# Altium PCB LED_Control.PcbDoc (part 2 of 3)
Units mil, origin at the board's own origin, x right, y up, seen from the top; angles counter-clockwise.
Board outline 2900 x 5000 mil, 4 copper layers (Top Layer, GND1, GND2, Bottom Layer), stack 51.864 mil thick; 163 components, 141 nets, 650 pads, 368 vias.
Unrouted connection lines stored in the file: 67.
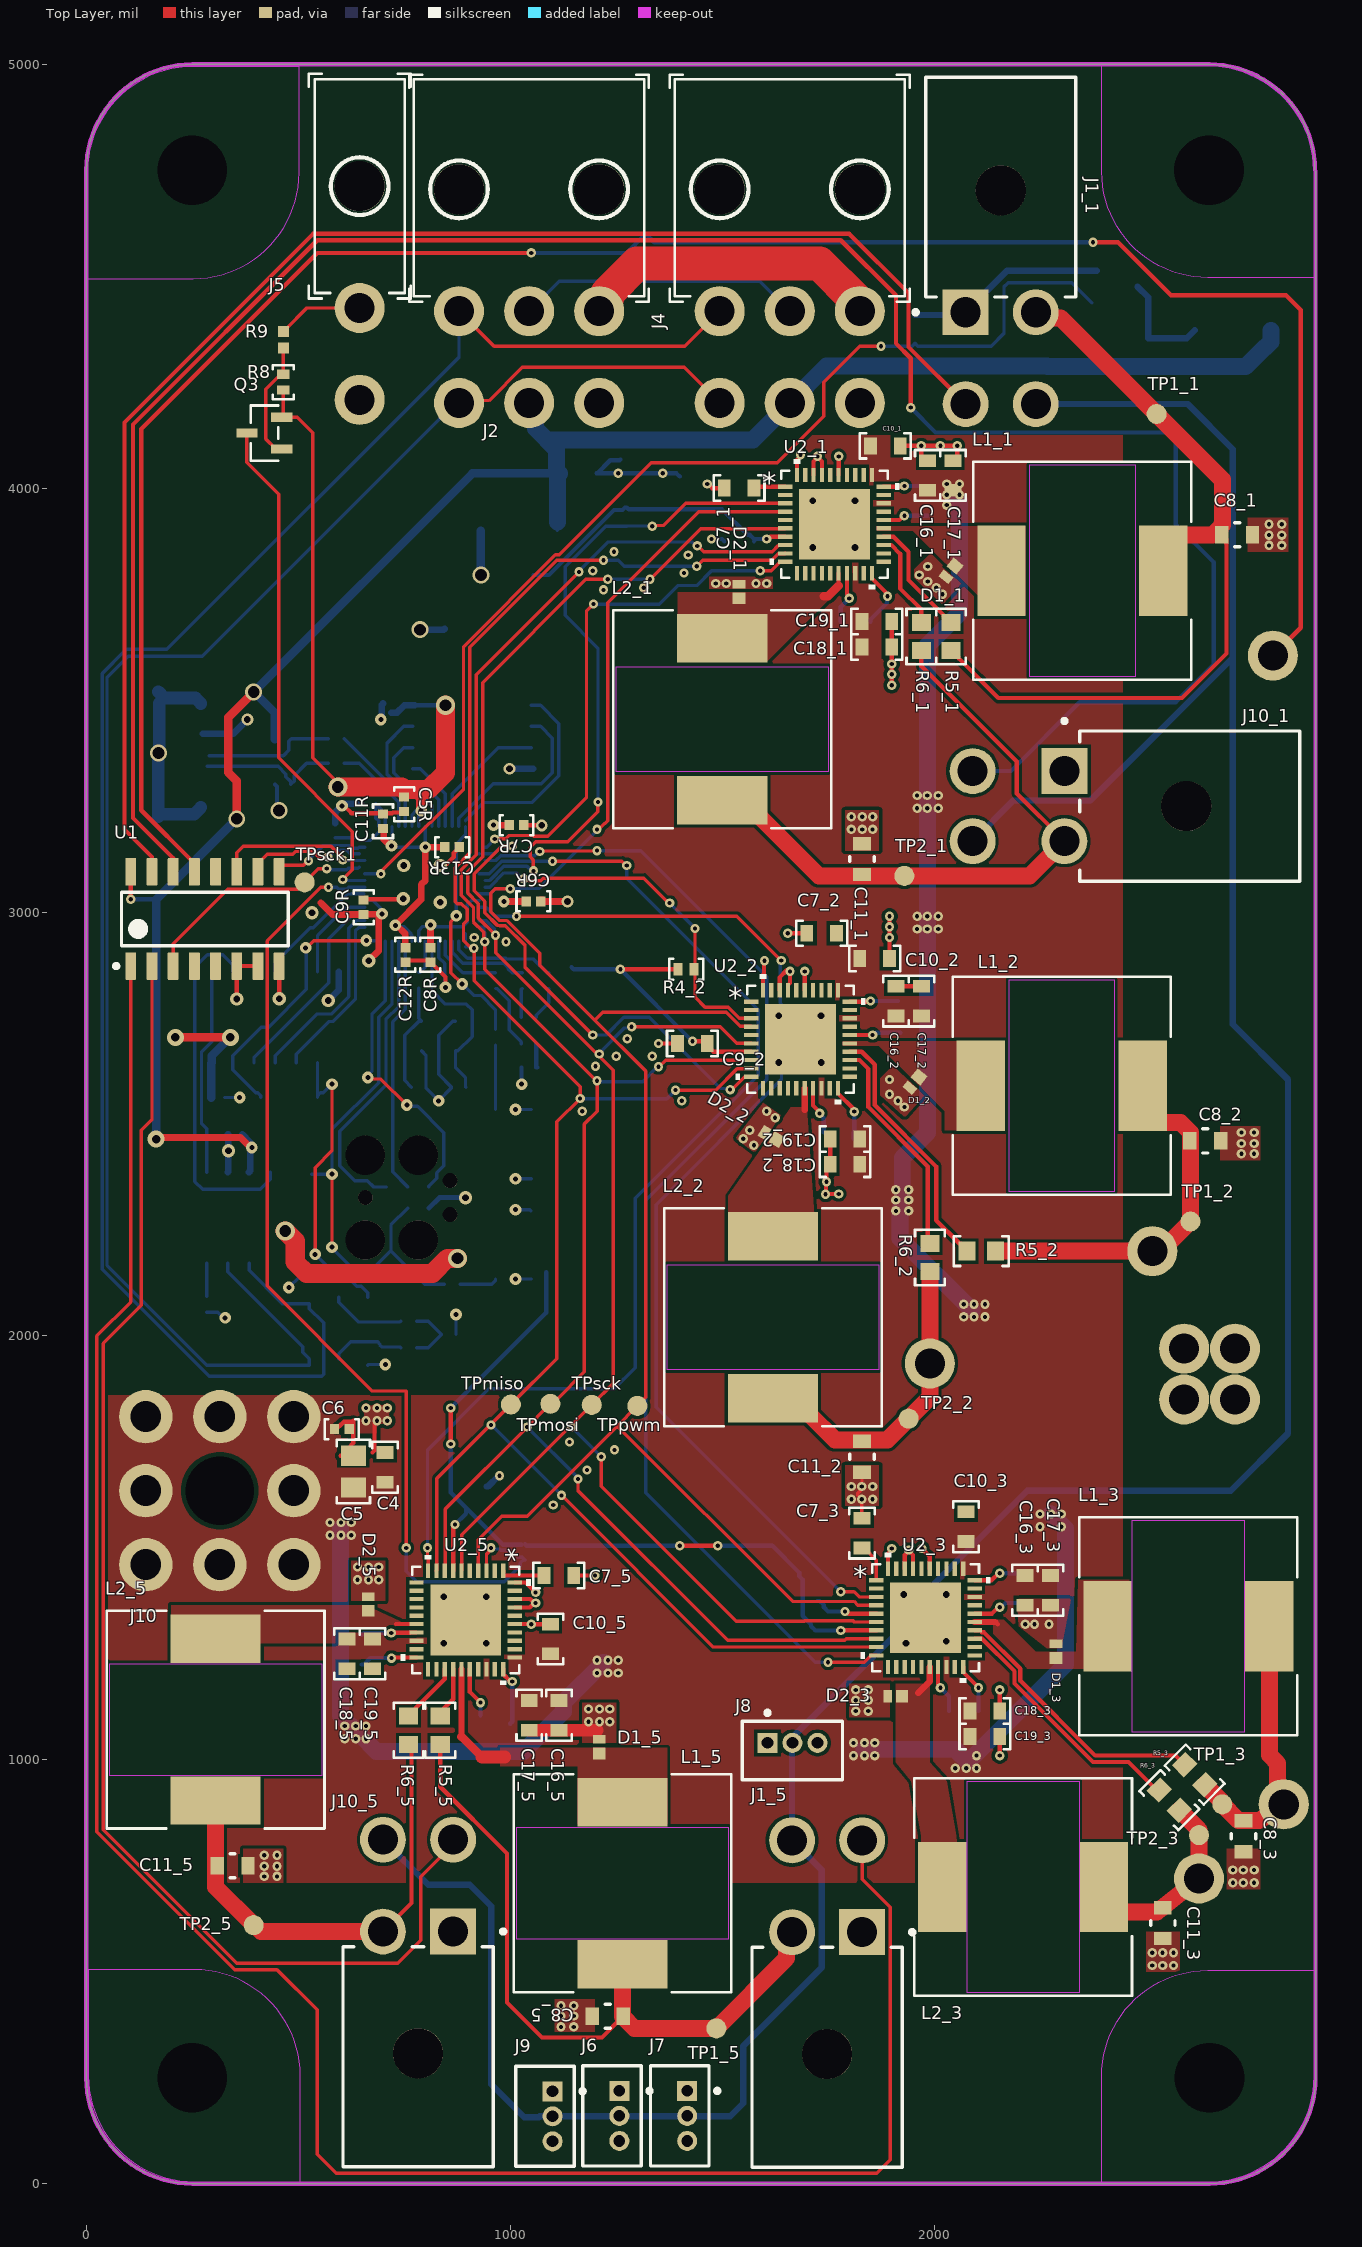
[diagram p0: Top Layer view]

## Via types
v1: diameter 22, hole 10, Top Layer to Bottom Layer, tented both sides, 231 vias
v2: diameter 22, hole 10, Top Layer to Bottom Layer, 60 vias
v3: diameter 27.56, hole 11.81, Top Layer to Bottom Layer, tented both sides, 33 vias
v4: diameter 31.5, hole 15.75, Top Layer to Bottom Layer, tented both sides, 27 vias
v5: diameter 40, hole 28, Top Layer to Bottom Layer, tented both sides, 6 vias
v6: diameter 28, hole 16, Top Layer to Bottom Layer, tented both sides, 4 vias
v7: diameter 45.28, hole 27.56, Top Layer to Bottom Layer, tented both sides, 4 vias
v8: diameter 40, hole 20, Top Layer to Bottom Layer, tented both sides, 3 vias

## Nets (pads, with @x,y where several pads share a name; then routed paths per layer and width w, separated by ;. In a path a pad name is that pad's centre, name@x,y a point inside that pad or via, vN(x,y) a via of type N, cw(c..) or ccw(c..) an arc to the next point about the centre after c; other vN are vias at no path point) (continued)
_Fan_PWR: (continued)
  Bottom Layer w15: J10_5.4@700,811.54 806.54,705 905,705 955,655 955,235 1032.86,157.14 1068.09,157.14 1070,159.06 1519.06,159.06 1550,190 1550,325 1735,510 1735,740 J1_5.4@1665,810 1665,1052.3 1980,1367.3 1980,1395 2220,1635 2700,1635 2835,1770 2835,2605 2705,2735 2705,3600.07 ; J10_1.4@2091.06,3167.32 2186.91,3263.17 2368.1,3263.17 2705,3600.07 ; J1_1.4@2240,4198.46 2598.5,4198.46 2705,4091.96 Q1.3@2705,4090.5 2705,3600.07
_Leak: J5.1 R9.1 | length 203
  Top Layer w8: R9.1@464.96,4369.96 465.28,4369.96 470.3,4374.98 470.3,4375.3 520,4425 J5.1@645,4425
_MISO: TPmiso.TP U1R.15 U2_1.9 U2_2.9 U2_3.9 U2_5.9 | length 4910.5
  Top Layer w8: U2_5.9@826.09,1446 827.09,1447 827.09,1663.66 TPmiso.TP@1001.71,1838.29 1110,1946.58 1110,2505 v1(1165,2560) 1165,2588.21 915,2838.21 915,2914.01 v1(914.38,2914.63) 911.7,2917.31 905.34,2917.31 890,2932.65 890,2971.98 898.49,2980.47 898.49,3006.51 885,3020 874.69,3020 870,3024.69 870,3105 905,3140 905,3625 1110,3830 v1(1220,3830) ; v1(1121.17,1623.83) 1478.91,1266.09 U2_3.9@1864,1266.09 ; v1(1390,2580) 1485,2580 1535.09,2630.09 1568,2630.09 U2_2.9@1569,2631.09 ; v1(1440,3816.01) 1453.99,3830 1616.96,3830 1632.05,3845.08 1648,3845.08 U2_1.9@1649,3846.08
  Bottom Layer w8: U1R.15@894.49,2931.2 894.49,2949.51 ; U1R.15@894.55,2917.98 v1@907.25,2917.98 ; v1(955,1790) v1(1121.17,1623.83) ; v1(1165,2560) 1370,2560 v1(1390,2580) ; v1(1220,3830) 1255,3830 1268.99,3816.01 v1(1440,3816.01)
_MOSI: TPmosi.TP U1R.14 U2_1.8 U2_2.8 U2_3.8 U2_5.8 | length 4767.4
  Top Layer w8: U2_5.8@845.77,1446 846.77,1447 846.77,1591.78 v1(1040,1785) 1087.49,1832.49 TPmosi.TP@1102.49,1832.49 ; TPmosi.TP@1110,1840 1110,1850 1175,1915 1175,2500 1205,2530 v1(1205,2601.85) 1203.15,2601.85 940,2865 v1(940,2930) 937.87,2932.13 937.87,2952.13 913.46,2976.54 913.46,3011.23 889.69,3035 885,3039.69 885,3100 920,3135 920,3560 v1(1162.5,3802.5) ; v1(1160,1662.65) 1160,1635 1512.87,1282.13 1789.47,1282.13 1793.12,1285.78 U2_3.8@1864,1285.78 ; v1(1350,2635) 1350.98,2635 1366.75,2650.78 U2_2.8@1569,2650.78 ; v1(1441.17,3863.83) 1442.86,3863.83 1456.69,3850 1618.19,3850 1632.96,3864.78 1648,3864.78 U2_1.8@1649,3865.78
  Bottom Layer w8: U1R.14@927.46,2964.17 937.36,2964.17 937.42,2964.11 937.42,2954.22 940,2951.64 v1(940,2930) ; v1(1040,1785) 1160,1665 v1(1160,1662.65) ; v1(1162.5,3802.5) 1162.5,3804.85 1230.53,3872.87 1429.49,3872.87 1438.54,3863.83 v1(1441.17,3863.83) ; v1(1205,2601.85) 1206.85,2600 1312.47,2600 1347.47,2635 v1(1350,2635)
_PWM_CLK: TPpwm.TP U1R.9 U2_1.4 U2_2.4 U2_3.4 U2_5.4 | length 4586.7
  Top Layer w8: U2_5.4@924.53,1446 924.53,1519.54 980,1575 1040,1575 1250,1785 ; v1(1000,3055) 964.52,3055 954.35,3044.83 954.35,3000.65 975,2980 992.65,2980 1070,2902.65 1070,2875 1200,2745 ; v2(1205,3195) 1208.79,3195 1222.78,3208.99 1223.99,3208.99 1230,3215 1230,3730 1444.54,3944.53 U2_1.4@1649,3944.53 ; U2_2.4@1569,2729.53 1568,2730.53 1543.14,2730.53 1509.84,2763.83 1218.83,2763.83 1200,2745 ; 1780.52,1373.62 1666.38,1373.62 1255,1785 1250,1785 ; 1780.53,1373.62 1811.22,1373.62 1820.31,1364.54 U2_3.4@1864,1364.54 ; 1200,2745 1320,2625 1320,1855 TPpwm.TP@1300,1835 1250,1785
  Bottom Layer w8: U1R.9@927.46,3042.91 927.52,3042.98 952.5,3042.98 964.52,3055 v1(1000,3055) 1000.45,3055.45 1067.8,3055.45 1205,3192.65 v2(1205,3195)
_SCK_1: TPsck.TP U1R.13 U2_1.6 U2_2.6 U2_3.6 U2_5.6 | length 4678.6
  Top Layer w8: U2_5.6@885.15,1446 886.15,1447 886.15,1531.15 TPsck.TP@1192.5,1837.5 1242.83,1887.83 1242.83,2627.17 965.62,2904.38 v1(965.62,2945.37) 925,2985.99 925,3020 900,3045 900,3095 935,3130 935,3541.32 1178.68,3785 v1(1230,3785) ; v1(1215,1715) 1215,1645 1532.87,1327.13 1694.47,1327.13 1695.22,1327.87 1809.4,1327.87 1812.12,1325.15 U2_3.6@1864,1325.15 ; v1(1286.55,2729.19) 1495.81,2729.19 1534.84,2690.16 U2_2.6@1569,2690.16 ; v1(1330,3785) 1449.15,3904.16 1648,3904.16 U2_1.6@1649,3905.16
  Bottom Layer w8: U1R.13@927.46,2979.92 943.3,2979.92 946.11,2977.11 962.94,2960.28 962.94,2948.05 v1(965.62,2945.37) ; v1(1145,1785) v1(1215,1715) ; v1(1210,2665) 1210,2667.35 1269.16,2726.51 1283.87,2726.51 v1(1286.55,2729.19) ; v1(1230,3785) v1(1330,3785)
_temp1_5: 
_temp2_1:  | length 1903
  Bottom Layer w10: v2(1945,4190) 2003.54,4131.46 2564.14,4131.46 2570,4125.6 2570,3915 2660,3825 2660,3585 2570,3495 2343.45,3495 2181.12,3332.68 2091.06,3332.68
_temp2_2: 
_temp2_3: 
_temp2_4: 

## Text inside footprints (layer, text, board x,y; h text height)
U2_1: Top Overlay "*" at 1594.5,3988.45 h50; Mechanical 13 "*" at 1653.5,3988.45 h50
U2_2: Top Overlay "*" at 1514.5,2773.45 h50; Mechanical 13 "*" at 1573.5,2773.45 h50
U2_3: Top Overlay "*" at 1809.5,1408.45 h50; Mechanical 13 "*" at 1868.5,1408.45 h50
U2_5: Top Overlay "*" at 968.45,1500.5 h50 r270; Mechanical 13 "*" at 968.45,1441.5 h50 r270